# Altium PCB K601-6252双模带屏 VER 1.1 2026 10 16.PcbDoc (part 12 of 12)
Units mm, origin at the board's own origin, x right, y up, seen from the top; angles counter-clockwise.
Board outline 75.02 x 25.73 mm, 2 copper layers (Top Layer, Bottom Layer); 43 components, 67 nets, 219 pads, 157 vias.
Unrouted connection lines stored in the file: 1.
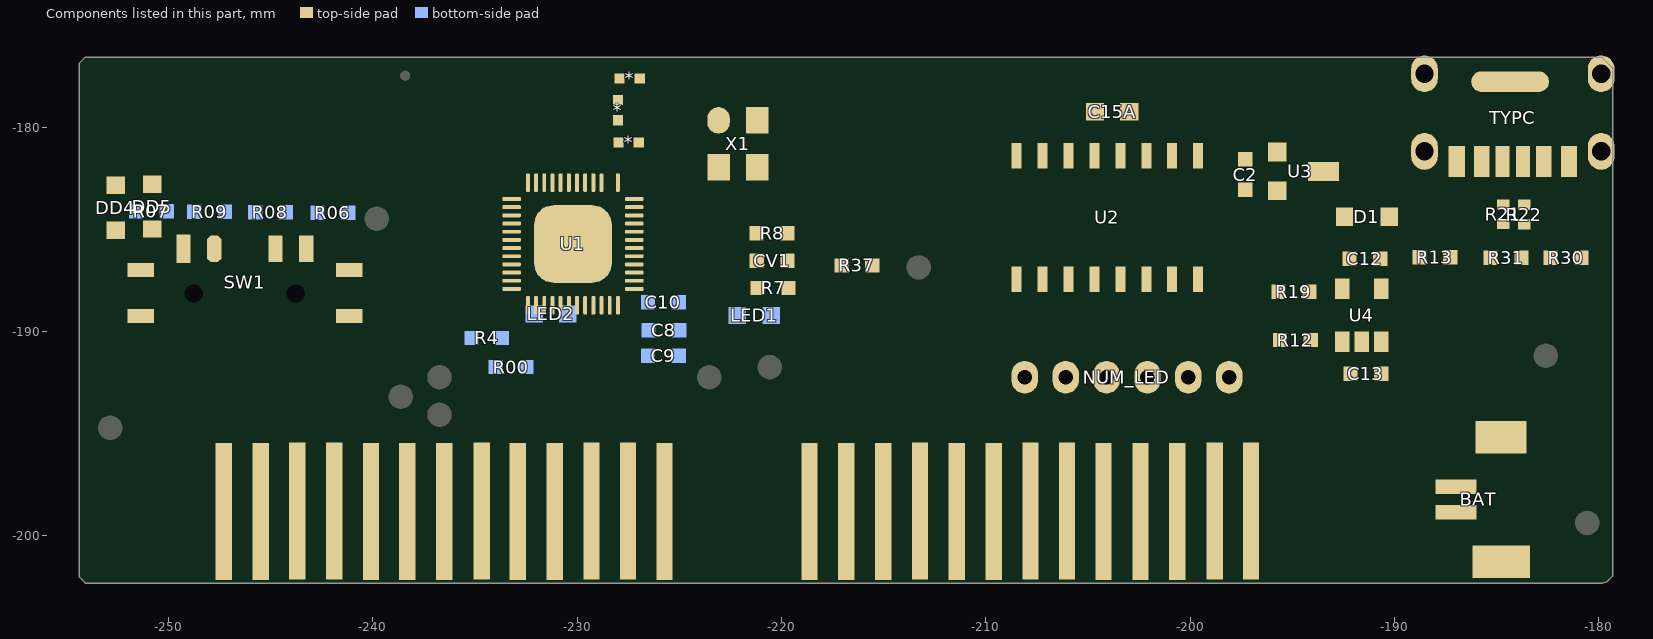
[diagram p12: the components of this part, seen from the top]

## Keep-outs
Keep-Out Layer:
  circle w0.127: c-42.75,-202.61 r2.175
  circle w0.127: c-71.75,-202.61 r2.175
  circle w0.127: c-13.75,-202.61 r2.175
  circle w0.127: c-13.75,-202.617 r2.175
  circle w0.127: c-71.75,-202.617 r2.175
  circle w0.127: c-42.75,-202.617 r2.175
  circle w0.127: c-13.75,-202.617 r2.175
  circle w0.127: c-71.75,-202.617 r2.175
  circle w0.127: c-42.75,-202.617 r2.175
  circle w0.127: c-13.75,-202.617 r2.175
  circle w0.127: c-71.75,-202.617 r2.175
  circle w0.127: c-42.75,-202.617 r2.175
  circle w0.127: c-42.75,-176.88 r2.175
  circle w0.127: c-71.75,-176.88 r2.175
  circle w0.127: c-13.75,-176.88 r2.175
  circle w0.127: c-42.75,-176.88 r2.175
  circle w0.127: c-71.75,-176.88 r2.175
  circle w0.127: c-13.75,-176.88 r2.175
  circle w0.127: c-42.75,-176.88 r2.175
  circle w0.127: c-71.75,-176.88 r2.175
  circle w0.127: c-13.75,-176.88 r2.175
  circle w0.127: c-13.75,-176.874 r2.175
  circle w0.127: c-71.75,-176.874 r2.175
  circle w0.127: c-42.75,-176.874 r2.175
  circle w0.127: c-42.75,-125.401 r2.175
  circle w0.127: c-71.75,-125.401 r2.175
  circle w0.127: c-13.75,-125.401 r2.175
  circle w0.127: c-13.75,-125.407 r2.175
  circle w0.127: c-71.75,-125.407 r2.175
  circle w0.127: c-42.75,-125.407 r2.175
  circle w0.127: c-13.75,-125.407 r2.175
  circle w0.127: c-71.75,-125.407 r2.175
  circle w0.127: c-42.75,-125.407 r2.175
  circle w0.127: c-13.75,-125.407 r2.175
  circle w0.127: c-71.75,-125.407 r2.175
  circle w0.127: c-42.75,-125.407 r2.175
  circle w0.127: c-42.75,-151.144 r2.175
  circle w0.127: c-71.75,-151.144 r2.175
  circle w0.127: c-13.75,-151.144 r2.175
  circle w0.127: c-42.75,-151.144 r2.175
  circle w0.127: c-71.75,-151.144 r2.175
  circle w0.127: c-13.75,-151.144 r2.175
  circle w0.127: c-42.75,-151.144 r2.175
  circle w0.127: c-71.75,-151.144 r2.175
  circle w0.127: c-13.75,-151.144 r2.175
  circle w0.127: c-13.75,-151.137 r2.175
  circle w0.127: c-71.75,-151.137 r2.175
  circle w0.127: c-42.75,-151.137 r2.175
  circle w0.127: c-42.75,-48.191 r2.175
  circle w0.127: c-71.75,-48.191 r2.175
  circle w0.127: c-13.75,-48.191 r2.175
  circle w0.127: c-13.75,-48.198 r2.175
  circle w0.127: c-71.75,-48.198 r2.175
  circle w0.127: c-42.75,-48.198 r2.175
  circle w0.127: c-13.75,-48.198 r2.175
  circle w0.127: c-71.75,-48.198 r2.175
  circle w0.127: c-42.75,-48.198 r2.175
  circle w0.127: c-13.75,-48.198 r2.175
  circle w0.127: c-71.75,-48.198 r2.175
  circle w0.127: c-42.75,-48.198 r2.175
  circle w0.127: c-42.75,-22.461 r2.175
  circle w0.127: c-71.75,-22.461 r2.175
  circle w0.127: c-13.75,-22.461 r2.175
  circle w0.127: c-42.75,-22.461 r2.175
  circle w0.127: c-71.75,-22.461 r2.175
  circle w0.127: c-13.75,-22.461 r2.175
  circle w0.127: c-42.75,-22.461 r2.175
  circle w0.127: c-71.75,-22.461 r2.175
  circle w0.127: c-13.75,-22.461 r2.175
  circle w0.127: c-13.75,-22.455 r2.175
  circle w0.127: c-71.75,-22.455 r2.175
  circle w0.127: c-42.75,-22.455 r2.175
  circle w0.127: c-42.75,-73.928 r2.175
  circle w0.127: c-71.75,-73.928 r2.175
  circle w0.127: c-13.75,-73.928 r2.175
  circle w0.127: c-13.75,-73.934 r2.175
  circle w0.127: c-71.75,-73.934 r2.175
  circle w0.127: c-42.75,-73.934 r2.175
  circle w0.127: c-13.75,-73.934 r2.175
  circle w0.127: c-71.75,-73.934 r2.175
  circle w0.127: c-42.75,-73.934 r2.175
  circle w0.127: c-13.75,-73.934 r2.175
  circle w0.127: c-71.75,-73.934 r2.175
  circle w0.127: c-42.75,-73.934 r2.175
  circle w0.127: c-42.75,-99.671 r2.175
  circle w0.127: c-71.75,-99.671 r2.175
  circle w0.127: c-13.75,-99.671 r2.175
  circle w0.127: c-42.75,-99.671 r2.175
  circle w0.127: c-71.75,-99.671 r2.175
  circle w0.127: c-13.75,-99.671 r2.175
  circle w0.127: c-42.75,-99.671 r2.175
  circle w0.127: c-71.75,-99.671 r2.175
  circle w0.127: c-13.75,-99.671 r2.175
  circle w0.127: c-13.75,-99.664 r2.175
  circle w0.127: c-71.75,-99.664 r2.175
  circle w0.127: c-42.75,-99.664 r2.175
  circle w0.127: c-117.75,-99.664 r2.175
  circle w0.127: c-146.75,-99.664 r2.175
  circle w0.127: c-88.75,-99.664 r2.175
  circle w0.127: c-88.75,-99.671 r2.175
  circle w0.127: c-146.75,-99.671 r2.175
  circle w0.127: c-117.75,-99.671 r2.175
  circle w0.127: c-88.75,-99.671 r2.175
  circle w0.127: c-146.75,-99.671 r2.175
  circle w0.127: c-117.75,-99.671 r2.175
  circle w0.127: c-88.75,-99.671 r2.175
  circle w0.127: c-146.75,-99.671 r2.175
  circle w0.127: c-117.75,-99.671 r2.175
  circle w0.127: c-117.75,-73.934 r2.175
  circle w0.127: c-146.75,-73.934 r2.175
  circle w0.127: c-88.75,-73.934 r2.175
  circle w0.127: c-117.75,-73.934 r2.175
  circle w0.127: c-146.75,-73.934 r2.175
  circle w0.127: c-88.75,-73.934 r2.175
  circle w0.127: c-117.75,-73.934 r2.175
  circle w0.127: c-146.75,-73.934 r2.175
  circle w0.127: c-88.75,-73.934 r2.175
  circle w0.127: c-88.75,-73.928 r2.175
  circle w0.127: c-146.75,-73.928 r2.175
  circle w0.127: c-117.75,-73.928 r2.175
  circle w0.127: c-117.75,-22.455 r2.175
  circle w0.127: c-146.75,-22.455 r2.175
  circle w0.127: c-88.75,-22.455 r2.175
  circle w0.127: c-88.75,-22.461 r2.175
  circle w0.127: c-146.75,-22.461 r2.175
  circle w0.127: c-117.75,-22.461 r2.175
  circle w0.127: c-88.75,-22.461 r2.175
  circle w0.127: c-146.75,-22.461 r2.175
  circle w0.127: c-117.75,-22.461 r2.175
  circle w0.127: c-88.75,-22.461 r2.175
  circle w0.127: c-146.75,-22.461 r2.175
  circle w0.127: c-117.75,-22.461 r2.175
  circle w0.127: c-117.75,-48.198 r2.175
  circle w0.127: c-146.75,-48.198 r2.175
  circle w0.127: c-88.75,-48.198 r2.175
  circle w0.127: c-117.75,-48.198 r2.175
  circle w0.127: c-146.75,-48.198 r2.175
  circle w0.127: c-88.75,-48.198 r2.175
  circle w0.127: c-117.75,-48.198 r2.175
  circle w0.127: c-146.75,-48.198 r2.175
  circle w0.127: c-88.75,-48.198 r2.175
  circle w0.127: c-88.75,-48.191 r2.175
  circle w0.127: c-146.75,-48.191 r2.175
  circle w0.127: c-117.75,-48.191 r2.175
  circle w0.127: c-117.75,-151.137 r2.175
  circle w0.127: c-146.75,-151.137 r2.175
  circle w0.127: c-88.75,-151.137 r2.175
  circle w0.127: c-88.75,-151.144 r2.175
  circle w0.127: c-146.75,-151.144 r2.175
  circle w0.127: c-117.75,-151.144 r2.175
  circle w0.127: c-88.75,-151.144 r2.175
  circle w0.127: c-146.75,-151.144 r2.175
  circle w0.127: c-117.75,-151.144 r2.175
  circle w0.127: c-88.75,-151.144 r2.175
  circle w0.127: c-146.75,-151.144 r2.175
  circle w0.127: c-117.75,-151.144 r2.175
  circle w0.127: c-117.75,-125.407 r2.175
  circle w0.127: c-146.75,-125.407 r2.175
  circle w0.127: c-88.75,-125.407 r2.175
  circle w0.127: c-117.75,-125.407 r2.175
  circle w0.127: c-146.75,-125.407 r2.175
  circle w0.127: c-88.75,-125.407 r2.175
  circle w0.127: c-117.75,-125.407 r2.175
  circle w0.127: c-146.75,-125.407 r2.175
  circle w0.127: c-88.75,-125.407 r2.175
  circle w0.127: c-88.75,-125.401 r2.175
  circle w0.127: c-146.75,-125.401 r2.175
  circle w0.127: c-117.75,-125.401 r2.175
  circle w0.127: c-117.75,-176.874 r2.175
  circle w0.127: c-146.75,-176.874 r2.175
  circle w0.127: c-88.75,-176.874 r2.175
  circle w0.127: c-88.75,-176.88 r2.175
  circle w0.127: c-146.75,-176.88 r2.175
  circle w0.127: c-117.75,-176.88 r2.175
  circle w0.127: c-88.75,-176.88 r2.175
  circle w0.127: c-146.75,-176.88 r2.175
  circle w0.127: c-117.75,-176.88 r2.175
  circle w0.127: c-88.75,-176.88 r2.175
  circle w0.127: c-146.75,-176.88 r2.175
  circle w0.127: c-117.75,-176.88 r2.175
  circle w0.127: c-117.75,-202.617 r2.175
  circle w0.127: c-146.75,-202.617 r2.175
  circle w0.127: c-88.75,-202.617 r2.175
  circle w0.127: c-117.75,-202.617 r2.175
  circle w0.127: c-146.75,-202.617 r2.175
  circle w0.127: c-88.75,-202.617 r2.175
  circle w0.127: c-117.75,-202.617 r2.175
  circle w0.127: c-146.75,-202.617 r2.175
  circle w0.127: c-88.75,-202.617 r2.175
  circle w0.127: c-88.75,-202.61 r2.175
  circle w0.127: c-146.75,-202.61 r2.175
  circle w0.127: c-117.75,-202.61 r2.175
  circle w0.127: c-222.1,-199.041 r2.175
  circle w0.127: c-251.1,-199.041 r2.175
  circle w0.127: c-193.1,-199.041 r2.175
  circle w0.127: c-193.1,-199.048 r2.175
  circle w0.127: c-251.1,-199.048 r2.175
  circle w0.127: c-222.1,-199.048 r2.175
  circle w0.127: c-193.1,-199.048 r2.175
  circle w0.127: c-251.1,-199.048 r2.175
  circle w0.127: c-222.1,-199.048 r2.175
  circle w0.127: c-193.1,-199.048 r2.175
  circle w0.127: c-251.1,-199.048 r2.175
  circle w0.127: c-222.1,-199.048 r2.175
  lines w0.127: -179.85,-176.586 -253.85,-176.586 ccw(c-253.85,-177.086) -254.35,-177.086 -254.35,-201.816 ccw(c-253.85,-201.816) -253.85,-202.316 -179.85,-202.316 ccw(c-179.85,-201.816) -179.35,-201.816 -179.35,-177.086 ; -179.843,-176.593 cw(c-179.843,-177.093) -179.343,-177.093 ; 3.5,-205.892 0,-205.892 ; 3.5,-205.892 3.5,0 0,0 ; -254.35,-201.823 ccw(c-253.85,-201.823) -253.85,-202.323 ; -254.35,-201.823 ccw(c-253.85,-201.823) -253.85,-202.323 ; -254.35,-201.823 ccw(c-253.85,-201.823) -253.85,-202.323 ; -254.35,-201.823 -254.35,-177.093 ; -254.35,-201.823 -254.35,-177.093 ; -254.35,-201.823 -254.35,-177.093 ; -254.35,-177.093 cw(c-253.85,-177.093) -253.85,-176.593 ; -254.35,-177.093 cw(c-253.85,-177.093) -253.85,-176.593 ; -254.35,-177.093 cw(c-253.85,-177.093) -253.85,-176.593 ; -253.85,-202.323 -179.85,-202.323 ; -253.85,-202.323 -179.85,-202.323 ; -253.85,-176.593 -179.85,-176.593 -253.85,-176.593 ; -249.691,-189.542 -242.791,-189.542 ; -249.691,-189.542 -242.791,-189.542 ; -249.691,-189.542 -249.691,-192.617 -242.791,-192.617 -242.791,-189.542 ; -179.85,-202.323 ccw(c-179.85,-201.823) -179.35,-201.823 ; -179.85,-202.323 ccw(c-179.85,-201.823) -179.35,-201.823 ; -179.35,-201.823 -179.35,-177.093 -179.35,-201.823 ; -150,-205.892 -153.5,-205.892 -153.5,0 -150,0 ; -150,-205.892 -150,-205.385 ; -150,-205.892 -149.5,-205.892 ; -150,-205.392 ccw(c-149.5,-205.392) -149.5,-205.892 ; -150,-205.392 ccw(c-149.5,-205.392) -149.5,-205.892 ; -150,-205.392 ccw(c-149.5,-205.392) -149.5,-205.892 ; -150,-205.392 -150,-180.662 ; -150,-205.392 -150,-180.662 ; -150,-205.392 -150,-180.662 ; -150,-205.385 ccw(c-149.5,-205.385) -149.5,-205.885 -75.5,-205.885 ccw(c-75.5,-205.385) -75,-205.385 ; -150,-205.385 -150,-180.655 cw(c-149.5,-180.655) -149.5,-180.155 ; -150,-180.662 cw(c-149.5,-180.662) -149.5,-180.162 ; -150,-180.662 cw(c-149.5,-180.662) -149.5,-180.162 ; -150,-180.662 cw(c-149.5,-180.662) -149.5,-180.162 ; -150,-180.662 -150,-180.155 ; -150,-180.155 -149.5,-180.155 ; -150,-180.155 -150,-179.649 ; -150,-180.155 -149.5,-180.155 ; -150,-179.655 ccw(c-149.5,-179.655) -149.5,-180.155 ; -150,-179.655 ccw(c-149.5,-179.655) -149.5,-180.155 ; -150,-179.655 ccw(c-149.5,-179.655) -149.5,-180.155 ; -150,-179.655 -150,-154.925 ; -150,-179.655 -150,-154.925 ; -150,-179.655 -150,-154.925 ; -150,-179.649 ccw(c-149.5,-179.649) -149.5,-180.149 -75.5,-180.149 ccw(c-75.5,-179.649) -75,-179.649 ; -150,-179.649 -150,-154.919 cw(c-149.5,-154.919) -149.5,-154.419 ; -150,-154.925 cw(c-149.5,-154.925) -149.5,-154.425 ; -150,-154.925 cw(c-149.5,-154.925) -149.5,-154.425 ; -150,-154.925 cw(c-149.5,-154.925) -149.5,-154.425 ; -150,-154.925 -150,-154.419 ; -150,-154.419 -149.5,-154.419 ; -150,-154.419 -150,-153.912 ; -150,-154.419 -149.5,-154.419 ; -150,-153.919 ccw(c-149.5,-153.919) -149.5,-154.419 ; -150,-153.919 ccw(c-149.5,-153.919) -149.5,-154.419 ; -150,-153.919 ccw(c-149.5,-153.919) -149.5,-154.419 ; -150,-153.919 -150,-129.189 ; -150,-153.919 -150,-129.189 ; -150,-153.919 -150,-129.189 ; -150,-153.912 ccw(c-149.5,-153.912) -149.5,-154.412 -75.5,-154.412 ccw(c-75.5,-153.912) -75,-153.912 ; -150,-153.912 -150,-129.182 cw(c-149.5,-129.182) -149.5,-128.682 ; -150,-129.189 cw(c-149.5,-129.189) -149.5,-128.689 ; -150,-129.189 cw(c-149.5,-129.189) -149.5,-128.689 ; -150,-129.189 cw(c-149.5,-129.189) -149.5,-128.689 ; -150,-129.189 -150,-128.682 ; -150,-128.682 -149.5,-128.682 ; -150,-128.682 -150,-128.176 ; -150,-128.682 -149.5,-128.682 ; -150,-128.182 ccw(c-149.5,-128.182) -149.5,-128.682 ; -150,-128.182 ccw(c-149.5,-128.182) -149.5,-128.682 ; -150,-128.182 ccw(c-149.5,-128.182) -149.5,-128.682 ; -150,-128.182 -150,-103.452 ; -150,-128.182 -150,-103.452 ; -150,-128.182 -150,-103.452 ; -150,-128.176 ccw(c-149.5,-128.176) -149.5,-128.676 -75.5,-128.676 ccw(c-75.5,-128.176) -75,-128.176 ; -150,-128.176 -150,-103.446 cw(c-149.5,-103.446) -149.5,-102.946 ; -150,-103.452 cw(c-149.5,-103.452) -149.5,-102.952 ; -150,-103.452 cw(c-149.5,-103.452) -149.5,-102.952 ; -150,-103.452 cw(c-149.5,-103.452) -149.5,-102.952 ; -150,-103.452 -150,-102.946 ; -150,-102.946 -149.5,-102.946 ; -150,-102.946 -150,-102.439 ; -150,-102.946 -149.5,-102.946 ; -150,-102.446 ccw(c-149.5,-102.446) -149.5,-102.946 ; -150,-102.446 ccw(c-149.5,-102.446) -149.5,-102.946 ; -150,-102.446 ccw(c-149.5,-102.446) -149.5,-102.946 ; -150,-102.446 -150,-77.716 ; -150,-102.446 -150,-77.716 ; -150,-102.446 -150,-77.716 ; -150,-102.439 ccw(c-149.5,-102.439) -149.5,-102.939 -75.5,-102.939 ccw(c-75.5,-102.439) -75,-102.439 ; -150,-102.439 -150,-77.709 cw(c-149.5,-77.709) -149.5,-77.209 ; -150,-77.716 cw(c-149.5,-77.716) -149.5,-77.216 ; -150,-77.716 cw(c-149.5,-77.716) -149.5,-77.216 ; -150,-77.716 cw(c-149.5,-77.716) -149.5,-77.216 ; -150,-77.716 -150,-77.209 ; -150,-77.209 -149.5,-77.209 ; -150,-77.209 -150,-76.703 ; -150,-77.209 -149.5,-77.209 ; -150,-76.709 ccw(c-149.5,-76.709) -149.5,-77.209 ; -150,-76.709 ccw(c-149.5,-76.709) -149.5,-77.209 ; -150,-76.709 ccw(c-149.5,-76.709) -149.5,-77.209 ; -150,-76.709 -150,-51.979 ; -150,-76.709 -150,-51.979 ; -150,-76.709 -150,-51.979 ; -150,-76.703 ccw(c-149.5,-76.703) -149.5,-77.203 -75.5,-77.203 ccw(c-75.5,-76.703) -75,-76.703 ; -150,-76.703 -150,-51.973 cw(c-149.5,-51.973) -149.5,-51.473 ; -150,-51.979 cw(c-149.5,-51.979) -149.5,-51.479 ; -150,-51.979 cw(c-149.5,-51.979) -149.5,-51.479 ; -150,-51.979 cw(c-149.5,-51.979) -149.5,-51.479 ; -150,-51.979 -150,-51.473 ; -150,-51.473 -149.5,-51.473 ; -150,-51.473 -150,-50.966 ; -150,-51.473 -149.5,-51.473 ; -150,-50.973 ccw(c-149.5,-50.973) -149.5,-51.473 ; -150,-50.973 ccw(c-149.5,-50.973) -149.5,-51.473 ; -150,-50.973 ccw(c-149.5,-50.973) -149.5,-51.473 ; -150,-50.973 -150,-26.243 ; -150,-50.973 -150,-26.243 ; -150,-50.973 -150,-26.243 ; -150,-50.966 ccw(c-149.5,-50.966) -149.5,-51.466 -75.5,-51.466 ccw(c-75.5,-50.966) -75,-50.966 ; -150,-50.966 -150,-26.236 cw(c-149.5,-26.236) -149.5,-25.736 ; -150,-26.243 cw(c-149.5,-26.243) -149.5,-25.743 ; -150,-26.243 cw(c-149.5,-26.243) -149.5,-25.743 ; -150,-26.243 cw(c-149.5,-26.243) -149.5,-25.743 ; -150,-26.243 -150,-25.736 ; -150,-25.736 -149.5,-25.736 ; -150,-25.736 -150,-25.23 ; -150,-25.736 -149.5,-25.736 ; -150,-25.236 ccw(c-149.5,-25.236) -149.5,-25.736 ; -150,-25.236 ccw(c-149.5,-25.236) -149.5,-25.736 ; -150,-25.236 ccw(c-149.5,-25.236) -149.5,-25.736 ; -150,-25.236 -150,-0.506 ; -150,-25.236 -150,-0.506 ; -150,-25.236 -150,-0.506 ; -150,-25.23 ccw(c-149.5,-25.23) -149.5,-25.73 -75.5,-25.73 ccw(c-75.5,-25.23) -75,-25.23 ; -150,-25.23 -150,-0.5 cw(c-149.5,-0.5) -149.5,0 ; -150,-0.506 cw(c-149.5,-0.506) -149.5,-0.006 ; -150,-0.506 cw(c-149.5,-0.506) -149.5,-0.006 ; -150,-0.506 cw(c-149.5,-0.506) -149.5,-0.006 ; -150,-0.506 -150,0 ; -150,0 -149.5,0 ; -149.5,-205.892 -75.5,-205.892 ; -149.5,-205.892 -75.5,-205.892 ; -149.5,-180.162 -75.5,-180.162 -149.5,-180.162 ; -149.5,-180.155 -75.5,-180.155 ; -149.5,-180.155 -75.5,-180.155 ; -149.5,-180.155 -75.5,-180.155 ; -149.5,-154.425 -75.5,-154.425 -149.5,-154.425 ; -149.5,-154.419 -75.5,-154.419 ; -149.5,-154.419 -75.5,-154.419 ; -149.5,-154.419 -75.5,-154.419 ; -149.5,-128.689 -75.5,-128.689 -149.5,-128.689 ; -149.5,-128.682 -75.5,-128.682 ; -149.5,-128.682 -75.5,-128.682 ; -149.5,-128.682 -75.5,-128.682 ; -149.5,-102.952 -75.5,-102.952 -149.5,-102.952 ; -149.5,-102.946 -75.5,-102.946 ; -149.5,-102.946 -75.5,-102.946 ; -149.5,-102.946 -75.5,-102.946 ; -149.5,-77.216 -75.5,-77.216 -149.5,-77.216 ; -149.5,-77.209 -75.5,-77.209 ; -149.5,-77.209 -75.5,-77.209 ; -149.5,-77.209 -75.5,-77.209 ; -149.5,-51.479 -75.5,-51.479 -149.5,-51.479 ; -149.5,-51.473 -75.5,-51.473 ; -149.5,-51.473 -75.5,-51.473 ; -149.5,-51.473 -75.5,-51.473 ; -149.5,-25.743 -75.5,-25.743 -149.5,-25.743 ; -149.5,-25.736 -75.5,-25.736 ; -149.5,-25.736 -75.5,-25.736 ; -149.5,-25.736 -75.5,-25.736 ; -149.5,-0.006 -75.5,-0.006 -149.5,-0.006 ; -149.5,0 -75.5,0 ; -145.342,-193.111 -145.342,-196.186 -138.442,-196.186 -138.442,-193.111 ; -145.342,-193.111 -138.442,-193.111 ; -145.342,-193.111 -138.442,-193.111 ; -145.342,-167.374 -138.442,-167.374 ; -145.342,-167.374 -138.442,-167.374 ; -145.342,-167.374 -145.342,-170.449 -138.442,-170.449 -138.442,-167.374 ; -145.342,-141.638 -138.442,-141.638 ; -145.342,-141.638 -138.442,-141.638 ; -145.342,-141.638 -145.342,-144.713 -138.442,-144.713 -138.442,-141.638 ; -145.342,-115.901 -145.342,-118.976 -138.442,-118.976 -138.442,-115.901 ; -145.342,-115.901 -138.442,-115.901 ; -145.342,-115.901 -138.442,-115.901 ; -145.342,-90.165 -138.442,-90.165 ; -145.342,-90.165 -138.442,-90.165 ; -145.342,-90.165 -145.342,-93.24 -138.442,-93.24 -138.442,-90.165 ; -145.342,-64.429 -145.342,-67.504 -138.442,-67.504 -138.442,-64.429 ; -145.342,-64.429 -138.442,-64.429 ; -145.342,-64.429 -138.442,-64.429 ; -145.342,-38.692 -145.342,-41.767 -138.442,-41.767 -138.442,-38.692 ; -145.342,-38.692 -138.442,-38.692 ; -145.342,-38.692 -138.442,-38.692 ; -145.342,-12.956 -138.442,-12.956 ; -145.342,-12.956 -138.442,-12.956 ; -145.342,-12.956 -145.342,-16.031 -138.442,-16.031 -138.442,-12.956 ; -75.5,-205.892 ccw(c-75.5,-205.392) -75,-205.392 ; -75.5,-205.892 ccw(c-75.5,-205.392) -75,-205.392 ; -75.5,-205.892 -75,-205.892 ; -75.5,-180.155 ccw(c-75.5,-179.655) -75,-179.655 ; -75.5,-180.155 ccw(c-75.5,-179.655) -75,-179.655 ; -75.5,-180.155 cw(c-75.5,-180.655) -75,-180.655 ; -75.5,-180.155 -75,-180.155 ; -75.5,-180.155 -75,-180.155 ; -75.5,-154.419 ccw(c-75.5,-153.919) -75,-153.919 ; -75.5,-154.419 ccw(c-75.5,-153.919) -75,-153.919 ; -75.5,-154.419 cw(c-75.5,-154.919) -75,-154.919 ; -75.5,-154.419 -75,-154.419 ; -75.5,-154.419 -75,-154.419 ; -75.5,-128.682 cw(c-75.5,-129.182) -75,-129.182 ; -75.5,-128.682 ccw(c-75.5,-128.182) -75,-128.182 ; -75.5,-128.682 ccw(c-75.5,-128.182) -75,-128.182 ; -75.5,-128.682 -75,-128.682 ; -75.5,-128.682 -75,-128.682 ; -75.5,-102.946 ccw(c-75.5,-102.446) -75,-102.446 ; -75.5,-102.946 ccw(c-75.5,-102.446) -75,-102.446 ; -75.5,-102.946 cw(c-75.5,-103.446) -75,-103.446 ; -75.5,-102.946 -75,-102.946 ; -75.5,-102.946 -75,-102.946 ; -75.5,-77.209 cw(c-75.5,-77.709) -75,-77.709 ; -75.5,-77.209 ccw(c-75.5,-76.709) -75,-76.709 ; -75.5,-77.209 ccw(c-75.5,-76.709) -75,-76.709 ; -75.5,-77.209 -75,-77.209 ; -75.5,-77.209 -75,-77.209 ; -75.5,-51.473 cw(c-75.5,-51.973) -75,-51.973 ; -75.5,-51.473 ccw(c-75.5,-50.973) -75,-50.973 ; -75.5,-51.473 ccw(c-75.5,-50.973) -75,-50.973 ; -75.5,-51.473 -75,-51.473 ; -75.5,-51.473 -75,-51.473 ; -75.5,-25.736 ccw(c-75.5,-25.236) -75,-25.236 ; -75.5,-25.736 ccw(c-75.5,-25.236) -75,-25.236 ; -75.5,-25.736 cw(c-75.5,-26.236) -75,-26.236 ; -75.5,-25.736 -75,-25.736 ; -75.5,-25.736 -75,-25.736 ; -75.5,0 cw(c-75.5,-0.5) -75,-0.5 ; -75.5,0 -75,0 ; -75,-205.892 -74.5,-205.892 ; -75,-205.892 -75,-205.385 ; -75,-205.892 -75,-205.385 ; -75,-205.392 ccw(c-74.5,-205.392) -74.5,-205.892 ; -75,-205.392 ccw(c-74.5,-205.392) -74.5,-205.892 ; -75,-205.392 ccw(c-74.5,-205.392) -74.5,-205.892 ; -75,-205.392 -75,-180.662 ; -75,-205.392 -75,-180.662 ; -75,-205.392 -75,-180.662 ; -75,-205.392 -75,-180.662 ; -75,-205.392 -75,-180.662 ; -75,-205.385 ccw(c-74.5,-205.385) -74.5,-205.885 -0.5,-205.885 ccw(c-0.5,-205.385) 0,-205.385 ; -75,-205.385 -75,-180.655 ; -75,-205.385 -75,-180.655 ; -75,-180.662 cw(c-74.5,-180.662) -74.5,-180.162 ; -75,-180.662 cw(c-74.5,-180.662) -74.5,-180.162 ; -75,-180.662 cw(c-74.5,-180.662) -74.5,-180.162 ; -75,-180.662 -75,-180.155 ; -75,-180.662 -75,-180.155 ; -75,-180.655 cw(c-74.5,-180.655) -74.5,-180.155 ; -75,-180.155 -74.5,-180.155 ; -75,-180.155 -75,-179.649 ; -75,-180.155 -74.5,-180.155 ; -75,-180.155 -75,-179.649 ; -75,-179.655 ccw(c-74.5,-179.655) -74.5,-180.155 ; -75,-179.655 ccw(c-74.5,-179.655) -74.5,-180.155 ; -75,-179.655 ccw(c-74.5,-179.655) -74.5,-180.155 ; -75,-179.655 -75,-154.925 ; -75,-179.655 -75,-154.925 ; -75,-179.655 -75,-154.925 ; -75,-179.655 -75,-154.925 ; -75,-179.655 -75,-154.925 ; -75,-179.649 ccw(c-74.5,-179.649) -74.5,-180.149 -0.5,-180.149 ccw(c-0.5,-179.649) 0,-179.649 ; -75,-179.649 -75,-154.919 ; -75,-179.649 -75,-154.919 ; -75,-154.925 cw(c-74.5,-154.925) -74.5,-154.425 ; -75,-154.925 cw(c-74.5,-154.925) -74.5,-154.425 ; -75,-154.925 cw(c-74.5,-154.925) -74.5,-154.425 ; -75,-154.925 -75,-154.419 ; -75,-154.925 -75,-154.419 ; -75,-154.919 cw(c-74.5,-154.919) -74.5,-154.419 ; -75,-154.419 -74.5,-154.419 ; -75,-154.419 -75,-153.912 ; -75,-154.419 -74.5,-154.419 ; -75,-154.419 -75,-153.912 ; -75,-153.919 ccw(c-74.5,-153.919) -74.5,-154.419 ; -75,-153.919 ccw(c-74.5,-153.919) -74.5,-154.419 ; -75,-153.919 ccw(c-74.5,-153.919) -74.5,-154.419 ; -75,-153.919 -75,-129.189 ; -75,-153.919 -75,-129.189 ; -75,-153.919 -75,-129.189 ; -75,-153.919 -75,-129.189 ; -75,-153.919 -75,-129.189 ; -75,-153.912 ccw(c-74.5,-153.912) -74.5,-154.412 -0.5,-154.412 ccw(c-0.5,-153.912) 0,-153.912 ; -75,-153.912 -75,-129.182 ; -75,-153.912 -75,-129.182 ; -75,-129.189 cw(c-74.5,-129.189) -74.5,-128.689 ; -75,-129.189 cw(c-74.5,-129.189) -74.5,-128.689 ; -75,-129.189 cw(c-74.5,-129.189) -74.5,-128.689 ; -75,-129.189 -75,-128.682 ; -75,-129.189 -75,-128.682 ; -75,-129.182 cw(c-74.5,-129.182) -74.5,-128.682 ; -75,-128.682 -74.5,-128.682 ; -75,-128.682 -75,-128.176 ; -75,-128.682 -74.5,-128.682 ; -75,-128.682 -75,-128.176 ; -75,-128.182 ccw(c-74.5,-128.182) -74.5,-128.682 ; -75,-128.182 ccw(c-74.5,-128.182) -74.5,-128.682 ; -75,-128.182 ccw(c-74.5,-128.182) -74.5,-128.682 ; -75,-128.182 -75,-103.452 ; -75,-128.182 -75,-103.452 ; -75,-128.182 -75,-103.452 ; -75,-128.182 -75,-103.452 ; -75,-128.182 -75,-103.452 ; -75,-128.176 ccw(c-74.5,-128.176) -74.5,-128.676 -0.5,-128.676 ccw(c-0.5,-128.176) 0,-128.176 ; -75,-128.176 -75,-103.446 ; -75,-128.176 -75,-103.446 ; -75,-103.452 cw(c-74.5,-103.452) -74.5,-102.952 ; -75,-103.452 cw(c-74.5,-103.452) -74.5,-102.952 ; -75,-103.452 cw(c-74.5,-103.452) -74.5,-102.952 ; -75,-103.452 -75,-102.946 ; -75,-103.452 -75,-102.946 ; -75,-103.446 cw(c-74.5,-103.446) -74.5,-102.946 ; -75,-102.946 -74.5,-102.946 ; -75,-102.946 -75,-102.439 ; -75,-102.946 -74.5,-102.946 ; -75,-102.946 -75,-102.439 ; -75,-102.446 ccw(c-74.5,-102.446) -74.5,-102.946 ; -75,-102.446 ccw(c-74.5,-102.446) -74.5,-102.946 ; -75,-102.446 ccw(c-74.5,-102.446) -74.5,-102.946 ; -75,-102.446 -75,-77.716 ; -75,-102.446 -75,-77.716 ; -75,-102.446 -75,-77.716 ; -75,-102.446 -75,-77.716 ; -75,-102.446 -75,-77.716 ; -75,-102.439 ccw(c-74.5,-102.439) -74.5,-102.939 -0.5,-102.939 ccw(c-0.5,-102.439) 0,-102.439 ; -75,-102.439 -75,-77.709 ; -75,-102.439 -75,-77.709 ; -75,-77.716 cw(c-74.5,-77.716) -74.5,-77.216 ; -75,-77.716 cw(c-74.5,-77.716) -74.5,-77.216 ; -75,-77.716 cw(c-74.5,-77.716) -74.5,-77.216 ; -75,-77.716 -75,-77.209 ; -75,-77.716 -75,-77.209 ; -75,-77.709 cw(c-74.5,-77.709) -74.5,-77.209 ; -75,-77.209 -74.5,-77.209 ; -75,-77.209 -75,-76.703 ; -75,-77.209 -74.5,-77.209 ; -75,-77.209 -75,-76.703 ; -75,-76.709 ccw(c-74.5,-76.709) -74.5,-77.209 ; -75,-76.709 ccw(c-74.5,-76.709) -74.5,-77.209 ; -75,-76.709 ccw(c-74.5,-76.709) -74.5,-77.209 ; -75,-76.709 -75,-51.979 ; -75,-76.709 -75,-51.979 ; -75,-76.709 -75,-51.979 ; -75,-76.709 -75,-51.979 ; -75,-76.709 -75,-51.979 ; -75,-76.703 ccw(c-74.5,-76.703) -74.5,-77.203 -0.5,-77.203 ccw(c-0.5,-76.703) 0,-76.703 ; -75,-76.703 -75,-51.973 ; -75,-76.703 -75,-51.973 ; -75,-51.979 cw(c-74.5,-51.979) -74.5,-51.479 ; -75,-51.979 cw(c-74.5,-51.979) -74.5,-51.479 ; -75,-51.979 cw(c-74.5,-51.979) -74.5,-51.479 ; -75,-51.979 -75,-51.473 ; -75,-51.979 -75,-51.473 ; -75,-51.973 cw(c-74.5,-51.973) -74.5,-51.473 ; -75,-51.473 -74.5,-51.473 ; -75,-51.473 -75,-50.966 ; -75,-51.473 -74.5,-51.473 ; -75,-51.473 -75,-50.966 ; -75,-50.973 ccw(c-74.5,-50.973) -74.5,-51.473 ; -75,-50.973 ccw(c-74.5,-50.973) -74.5,-51.473 ; -75,-50.973 ccw(c-74.5,-50.973) -74.5,-51.473 ; -75,-50.973 -75,-26.243 ; -75,-50.973 -75,-26.243 ; -75,-50.973 -75,-26.243 ; -75,-50.973 -75,-26.243 ; -75,-50.973 -75,-26.243 ; -75,-50.966 ccw(c-74.5,-50.966) -74.5,-51.466 -0.5,-51.466 ccw(c-0.5,-50.966) 0,-50.966 ; -75,-50.966 -75,-26.236 ; -75,-50.966 -75,-26.236 ; -75,-26.243 cw(c-74.5,-26.243) -74.5,-25.743 ; -75,-26.243 cw(c-74.5,-26.243) -74.5,-25.743 ; -75,-26.243 cw(c-74.5,-26.243) -74.5,-25.743 ; -75,-26.243 -75,-25.736 ; -75,-26.243 -75,-25.736 ; -75,-26.236 cw(c-74.5,-26.236) -74.5,-25.736 ; -75,-25.736 -74.5,-25.736 ; -75,-25.736 -75,-25.23 ; -75,-25.736 -74.5,-25.736 ; -75,-25.736 -75,-25.23 ; -75,-25.236 ccw(c-74.5,-25.236) -74.5,-25.736 ; -75,-25.236 ccw(c-74.5,-25.236) -74.5,-25.736 ; -75,-25.236 ccw(c-74.5,-25.236) -74.5,-25.736 ; -75,-25.236 -75,-0.506 ; -75,-25.236 -75,-0.506 ; -75,-25.236 -75,-0.506 ; -75,-25.236 -75,-0.506 ; -75,-25.236 -75,-0.506 ; -75,-25.23 ccw(c-74.5,-25.23) -74.5,-25.73 -0.5,-25.73 ccw(c-0.5,-25.23) 0,-25.23 ; -75,-25.23 -75,-0.5 ; -75,-25.23 -75,-0.5 ; -75,-0.506 cw(c-74.5,-0.506) -74.5,-0.006 ; -75,-0.506 cw(c-74.5,-0.506) -74.5,-0.006 ; -75,-0.506 cw(c-74.5,-0.506) -74.5,-0.006 ; -75,-0.506 -75,0 ; -75,-0.506 -75,0 ; -75,-0.5 cw(c-74.5,-0.5) -74.5,0 ; -75,0 -74.5,0 ; -74.5,-205.892 -0.5,-205.892 ; -74.5,-205.892 -0.5,-205.892 ; -74.5,-180.162 -0.5,-180.162 -74.5,-180.162 ; -74.5,-180.155 -0.5,-180.155 ; -74.5,-180.155 -0.5,-180.155 ; -74.5,-180.155 -0.5,-180.155 ; -74.5,-154.425 -0.5,-154.425 -74.5,-154.425 ; -74.5,-154.419 -0.5,-154.419 ; -74.5,-154.419 -0.5,-154.419 ; -74.5,-154.419 -0.5,-154.419 ; -74.5,-128.689 -0.5,-128.689 -74.5,-128.689 ; -74.5,-128.682 -0.5,-128.682 ; -74.5,-128.682 -0.5,-128.682 ; -74.5,-128.682 -0.5,-128.682 ; -74.5,-102.952 -0.5,-102.952 -74.5,-102.952 ; -74.5,-102.946 -0.5,-102.946 ; -74.5,-102.946 -0.5,-102.946 ; -74.5,-102.946 -0.5,-102.946 ; -74.5,-77.216 -0.5,-77.216 -74.5,-77.216 ; -74.5,-77.209 -0.5,-77.209 ; -74.5,-77.209 -0.5,-77.209 ; -74.5,-77.209 -0.5,-77.209 ; -74.5,-51.479 -0.5,-51.479 -74.5,-51.479 ; -74.5,-51.473 -0.5,-51.473 ; -74.5,-51.473 -0.5,-51.473 ; -74.5,-51.473 -0.5,-51.473 ; -74.5,-25.743 -0.5,-25.743 -74.5,-25.743 ; -74.5,-25.736 -0.5,-25.736 ; -74.5,-25.736 -0.5,-25.736 ; -74.5,-25.736 -0.5,-25.736 ; -74.5,-0.006 -0.5,-0.006 -74.5,-0.006 ; -74.5,0 -0.5,0 ; -70.342,-193.111 -63.442,-193.111 ; -70.342,-193.111 -63.442,-193.111 ; -70.342,-193.111 -70.342,-196.186 -63.442,-196.186 -63.442,-193.111 ; -70.342,-167.374 -70.342,-170.449 -63.442,-170.449 -63.442,-167.374 ; -70.342,-167.374 -63.442,-167.374 ; -70.342,-167.374 -63.442,-167.374 ; -70.342,-141.638 -70.342,-144.713 -63.442,-144.713 -63.442,-141.638 ; -70.342,-141.638 -63.442,-141.638 ; -70.342,-141.638 -63.442,-141.638 ; -70.342,-115.901 -63.442,-115.901 ; -70.342,-115.901 -63.442,-115.901 ; -70.342,-115.901 -70.342,-118.976 -63.442,-118.976 -63.442,-115.901 ; -70.342,-90.165 -70.342,-93.24 -63.442,-93.24 -63.442,-90.165 ; -70.342,-90.165 -63.442,-90.165 ; -70.342,-90.165 -63.442,-90.165 ; -70.342,-64.429 -63.442,-64.429 ; -70.342,-64.429 -63.442,-64.429 ; -70.342,-64.429 -70.342,-67.504 -63.442,-67.504 -63.442,-64.429 ; -70.342,-38.692 -63.442,-38.692 ; -70.342,-38.692 -63.442,-38.692 ; -70.342,-38.692 -70.342,-41.767 -63.442,-41.767 -63.442,-38.692 ; -70.342,-12.956 -70.342,-16.031 -63.442,-16.031 -63.442,-12.956 ; -70.342,-12.956 -63.442,-12.956 ; -70.342,-12.956 -63.442,-12.956 ; -0.5,-205.892 ccw(c-0.5,-205.392) 0,-205.392 ; -0.5,-205.892 ccw(c-0.5,-205.392) 0,-205.392 ; -0.5,-205.892 0,-205.892 ; -0.5,-180.155 cw(c-0.5,-180.655) 0,-180.655 0,-205.385 ; -0.5,-180.155 ccw(c-0.5,-179.655) 0,-179.655 ; -0.5,-180.155 ccw(c-0.5,-179.655) 0,-179.655 ; -0.5,-180.155 0,-180.155 ; -0.5,-180.155 0,-180.155 ; -0.5,-154.419 cw(c-0.5,-154.919) 0,-154.919 0,-179.649 ; -0.5,-154.419 ccw(c-0.5,-153.919) 0,-153.919 ; -0.5,-154.419 ccw(c-0.5,-153.919) 0,-153.919 ; -0.5,-154.419 0,-154.419 ; -0.5,-154.419 0,-154.419 ; -0.5,-128.682 ccw(c-0.5,-128.182) 0,-128.182 ; -0.5,-128.682 ccw(c-0.5,-128.182) 0,-128.182 ; -0.5,-128.682 cw(c-0.5,-129.182) 0,-129.182 0,-153.912 ; -0.5,-128.682 0,-128.682 ; -0.5,-128.682 0,-128.682 ; -0.5,-102.946 cw(c-0.5,-103.446) 0,-103.446 0,-128.176 ; -0.5,-102.946 ccw(c-0.5,-102.446) 0,-102.446 ; -0.5,-102.946 ccw(c-0.5,-102.446) 0,-102.446 ; -0.5,-102.946 0,-102.946 ; -0.5,-102.946 0,-102.946 ; -0.5,-77.209 ccw(c-0.5,-76.709) 0,-76.709 ; -0.5,-77.209 ccw(c-0.5,-76.709) 0,-76.709 ; -0.5,-77.209 cw(c-0.5,-77.709) 0,-77.709 0,-102.439 ; -0.5,-77.209 0,-77.209 ; -0.5,-77.209 0,-77.209 ; -0.5,-51.473 ccw(c-0.5,-50.973) 0,-50.973 ; -0.5,-51.473 ccw(c-0.5,-50.973) 0,-50.973 ; -0.5,-51.473 cw(c-0.5,-51.973) 0,-51.973 0,-76.703 ; -0.5,-51.473 0,-51.473 ; -0.5,-51.473 0,-51.473 ; -0.5,-25.736 cw(c-0.5,-26.236) 0,-26.236 0,-50.966 ; -0.5,-25.736 ccw(c-0.5,-25.236) 0,-25.236 ; -0.5,-25.736 ccw(c-0.5,-25.236) 0,-25.236 ; -0.5,-25.736 0,-25.736 ; -0.5,-25.736 0,-25.736 ; -0.5,0 cw(c-0.5,-0.5) 0,-0.5 0,-25.23 ; -0.5,0 0,0 ; 0,-205.892 0,-205.385 ; 0,-205.392 0,-180.662 ; 0,-205.392 0,-180.662 ; 0,-180.662 0,-180.155 ; 0,-180.155 0,-179.649 ; 0,-179.655 0,-154.925 ; 0,-179.655 0,-154.925 ; 0,-154.925 0,-154.419 ; 0,-154.419 0,-153.912 ; 0,-153.919 0,-129.189 ; 0,-153.919 0,-129.189 ; 0,-129.189 0,-128.682 ; 0,-128.682 0,-128.176 ; 0,-128.182 0,-103.452 ; 0,-128.182 0,-103.452 ; 0,-103.452 0,-102.946 ; 0,-102.946 0,-102.439 ; 0,-102.446 0,-77.716 ; 0,-102.446 0,-77.716 ; 0,-77.716 0,-77.209 ; 0,-77.209 0,-76.703 ; 0,-76.709 0,-51.979 ; 0,-76.709 0,-51.979 ; 0,-51.979 0,-51.473 ; 0,-51.473 0,-50.966 ; 0,-50.973 0,-26.243 ; 0,-50.973 0,-26.243 ; 0,-26.243 0,-25.736 ; 0,-25.736 0,-25.23 ; 0,-25.236 0,-0.506 ; 0,-25.236 0,-0.506 ; 0,-0.506 0,0 ; -249.691,-192.61 -249.691,-189.535 -242.791,-189.535 -242.791,-192.61 -249.691,-192.61 ; -145.342,-196.179 -138.442,-196.179 -138.442,-193.104 -145.342,-193.104 -145.342,-196.179 ; -145.342,-170.443 -145.342,-167.368 -138.442,-167.368 -138.442,-170.443 -145.342,-170.443 ; -145.342,-144.706 -145.342,-141.631 -138.442,-141.631 -138.442,-144.706 -145.342,-144.706 ; -145.342,-118.97 -138.442,-118.97 -138.442,-115.895 -145.342,-115.895 -145.342,-118.97 ; -145.342,-93.234 -145.342,-90.159 -138.442,-90.159 -138.442,-93.234 -145.342,-93.234 ; -145.342,-67.497 -138.442,-67.497 -138.442,-64.422 -145.342,-64.422 -145.342,-67.497 ; -145.342,-41.761 -138.442,-41.761 -138.442,-38.686 -145.342,-38.686 -145.342,-41.761 ; -145.342,-16.024 -145.342,-12.949 -138.442,-12.949 -138.442,-16.024 -145.342,-16.024 ; -70.342,-196.179 -70.342,-193.104 -63.442,-193.104 -63.442,-196.179 -70.342,-196.179 ; -70.342,-170.443 -63.442,-170.443 -63.442,-167.368 -70.342,-167.368 -70.342,-170.443 ; -70.342,-144.706 -63.442,-144.706 -63.442,-141.631 -70.342,-141.631 -70.342,-144.706 ; -70.342,-118.97 -70.342,-115.895 -63.442,-115.895 -63.442,-118.97 -70.342,-118.97 ; -70.342,-93.234 -63.442,-93.234 -63.442,-90.159 -70.342,-90.159 -70.342,-93.234 ; -70.342,-67.497 -70.342,-64.422 -63.442,-64.422 -63.442,-67.497 -70.342,-67.497 ; -70.342,-41.761 -70.342,-38.686 -63.442,-38.686 -63.442,-41.761 -70.342,-41.761 ; -70.342,-16.024 -63.442,-16.024 -63.442,-12.949 -70.342,-12.949 -70.342,-16.024

## Other copper
Top Layer:
  rectangle net VCC3.3V: -228.075,-191.568 -227.525,-190.373
  rectangle net BAT+: -192.57,-194.873 -191.228,-194.079
  rectangle net BAT+: -246.6,-186.548 -245.05,-185.337
  rectangle net VABT: -189.35,-189.023 -188.71,-187.798
  rectangle net VABT: -189.375,-195.773 -188.75,-194.723
  rectangle net VABT: -192.575,-183.473 -191.575,-182.898
  region net VABT: -250.864,-192.209 -251.5,-191.573 -251.818,-191.891 -251.182,-192.527
  pour cut-out: -199.089,-181.944 -199.089,-182.785 -199.132,-182.828 -199.312,-182.828 -199.312,-182.048 -199.375,-181.986
  pour cut-out: -199.301,-180.476 -199.34,-180.516 -204.275,-180.516 -204.275,-180.679 -204.237,-180.716 -204.229,-180.708 -199.333,-180.708
  pour cut-out: -199.141,-188.255 -199.141,-189.188 -199.129,-189.201 -199.175,-189.248 -199.325,-189.248 -199.325,-188.27 -199.341,-188.254
  pour cut-out: -203.203,-186.565 -203.194,-186.556 -199.846,-186.556 -199.846,-186.696 -199.943,-186.792 -203.159,-186.792
  pour cut-out: -208.272,-186.549 -206.325,-186.549 -206.287,-186.587 -206.287,-186.768 -208.265,-186.768 -208.283,-186.75
  pour cut-out: -205.575,-182.273 -205.57,-182.278 -205.063,-182.278 -205.063,-182.087 -205.029,-182.053 -205.036,-182.046 -205.625,-182.046
Bottom Layer:
  rectangle net BAT+: -192.57,-194.873 -191.228,-194.079
  rectangle net BAT+: -246.6,-186.548 -245.225,-185.337
  rectangle net VABT: -189.375,-195.773 -188.75,-194.723
  rectangle net VABT: -189.35,-189.023 -188.71,-187.798
  rectangle net VABT: -192.575,-183.473 -191.575,-182.898
  region net VABT: -251.25,-192.523 -250.861,-192.134 -251.572,-191.423 -251.961,-191.812

## Silkscreen, mask and mechanical layers (free items; w line width, h text height)
Top Overlay:
  circle w0.2: c-238.625,-193.198 r0.775
  circle w0.2: c-236.725,-194.075 r0.763
  circle w0.2: c-236.725,-192.25 r0.691
  circle w0.2: c-239.8,-184.525 r0.763
  circle w0.2: c-220.578,-191.751 r0.763
  circle w0.2: c-223.525,-192.242 r0.763
  circle w0.2: c-213.275,-186.873 r0.763
  circle w0.2: c-182.6,-191.193 r0.763
  lines w0.254: -236.034,-193.673 -236.029,-193.673 -235.075,-192.719 ; -235.323,-192.719 -235.075,-192.719 ; -235.075,-193.03 -235.075,-192.719 ; -163.672,-5.402 -161.925,-0.162 ; -163.672,-200.814 -161.925,-206.054 ; -162.179,-206.054 -161.671,-206.054 ; -162.179,-0.162 -161.671,-0.162 ; -161.925,-132.325 -161.925,-206.054 ; -161.925,-73.891 -161.925,-0.162 ; -160.178,-200.814 -161.925,-206.054 ; -160.178,-5.402 -161.925,-0.162 ; -153.39,6.585 -153.39,7.093 ; -148.15,5.092 -153.39,6.839 ; -148.15,8.586 -153.39,6.839 ; -93.631,6.839 -153.39,6.839 ; -56.15,6.839 3.61,6.839 ; -1.63,5.092 3.61,6.839 ; -1.63,8.586 3.61,6.839 ; 3.61,6.585 3.61,7.093
  text "157 (mm)" at -93.377,4.068 h5.24
  text "205.892 (mm)" at -164.697,-74.145 h5.24 r270
  text "YUSYA" at -218.188,-179.093 h1
  text "K601-6252 VER1.1 双模带屏" at -249.49,-181.546 h1.6
  text "+" at -253,-181.945 h1
  text "+" at -251.473,-181.945 h1
  text "2026-10-16" at -249.425,-182.84 h0.8
  text "VPP" at -240.082,-183.498 h0.6
  text "2.4G/OFF/BT" at -249.4,-184.498 h0.8
  text "+" at -193.925,-184.798 h1
  text "3.3V" at -214.1,-185.673 h0.6
  text "+" at -250.6,-189.598 h1
  text "+" at -253.325,-189.748 h1
  text "SDI" at -236.251,-191.304 h0.6 r90
  text "SCK" at -238.45,-192.223 h0.6 r90
  text "SDO" at -234.2,-192.923 h0.6 r90
  text "C15" at -227.728,-193.422 h0.65 r270
  text "C10" at -226.053,-193.447 h0.65 r270
  text "C17" at -211.853,-193.547 h0.65 r270
  text "C16" at -213.553,-193.597 h0.65 r270
  text "C14" at -234.898,-193.723 h0.65 r270
  text "C3" at -243.978,-193.772 h0.65 r270
  text "C4" at -242.378,-193.797 h0.65 r270
  text "R6" at -199.389,-193.788 h0.65 r270
  text "C13" at -233.128,-193.822 h0.5 r270
  text "R4" at -202.778,-193.822 h0.65 r270
  text "R7" at -197.459,-193.813 h0.65 r270
  text "R5" at -201.078,-193.847 h0.65 r270
  text "C8" at -218.953,-193.872 h0.65 r270
  text "C2" at -245.928,-193.922 h0.65 r270
  text "C12" at -231.353,-193.922 h0.5 r270
  text "C0" at -215.328,-193.922 h0.65 r270
  text "C9" at -217.253,-193.947 h0.65 r270
  text "R3" at -204.575,-193.947 h0.65 r270
  text "R2" at -206.503,-193.972 h0.65 r270
  text "C5" at -240.503,-193.997 h0.65 r270
  text "R1" at -208.228,-193.997 h0.65 r270
  text "R0" at -209.975,-194.059 h0.65 r270
  text "C6" at -238.725,-194.105 h0.65 r270
  text "C1" at -247.528,-194.122 h0.65 r270
  text "C11" at -229.553,-194.122 h0.5 r270
  text "TX" at -223.15,-194.414 h0.6 r90
  text "RX" at -220.325,-194.398 h0.6 r90
  text "C7" at -236.075,-194.623 h0.4 r270
  text "+" at -182.045,-199.737 h1.5
Bottom Overlay:
  text "1" at -196.288,-186.958 h1
Top Solder:
  rectangle: 0.1,-11.5 1.6,-7.625
  rectangle: 0.075,-195.415 1.5,-191.645
  rectangle: -151.8,-196.845 -150.125,-192.95
  rectangle: -151.9,-14.3 -150.025,-10.525
  rectangle: -247.889,-202.248 -196.606,-195.323
  rectangle: -253.423,-180.302 -238.654,-176.798
Bottom Solder:
  rectangle: 0,-11.5 1.6,-7.625
  rectangle: 0.075,-195.415 1.5,-191.645
  rectangle: -151.8,-196.845 -150.125,-192.95
  rectangle: -151.9,-14.3 -150.025,-10.525
  rectangle: -253.423,-180.302 -238.654,-176.798
Mechanical 2:
  circle w0.127: c-198.091,-192.242 r0.255
  circle w0.127: c-200.091,-192.242 r0.255
  circle w0.127: c-202.091,-192.242 r0.255
  circle w0.127: c-204.091,-192.242 r0.255
  circle w0.127: c-206.091,-192.242 r0.255

## Text inside footprints (layer, text, board x,y; h text height)
NUM_LED: Bottom Overlay "%" at -207.52,-188.94 h1.5; Bottom Overlay "2.4G" at -197.106,-195.798 h0.8; Bottom Overlay "BT1" at -200.408,-195.798 h0.8; Bottom Overlay "BT2" at -203.329,-195.798 h0.8